# Altium PCB FPGA_Peripheral_Board.PcbDoc (part 2 of 5)
Units mm, origin at the board's own origin, x right, y up, seen from the top; angles counter-clockwise.
Board outline 78.8 x 69 mm, 4 copper layers (Top Layer, Int1 (GND), Int2 (PWR), Bottom Layer), stack 1.508 mm thick; 111 components, 280 nets, 1262 pads, 728 vias.
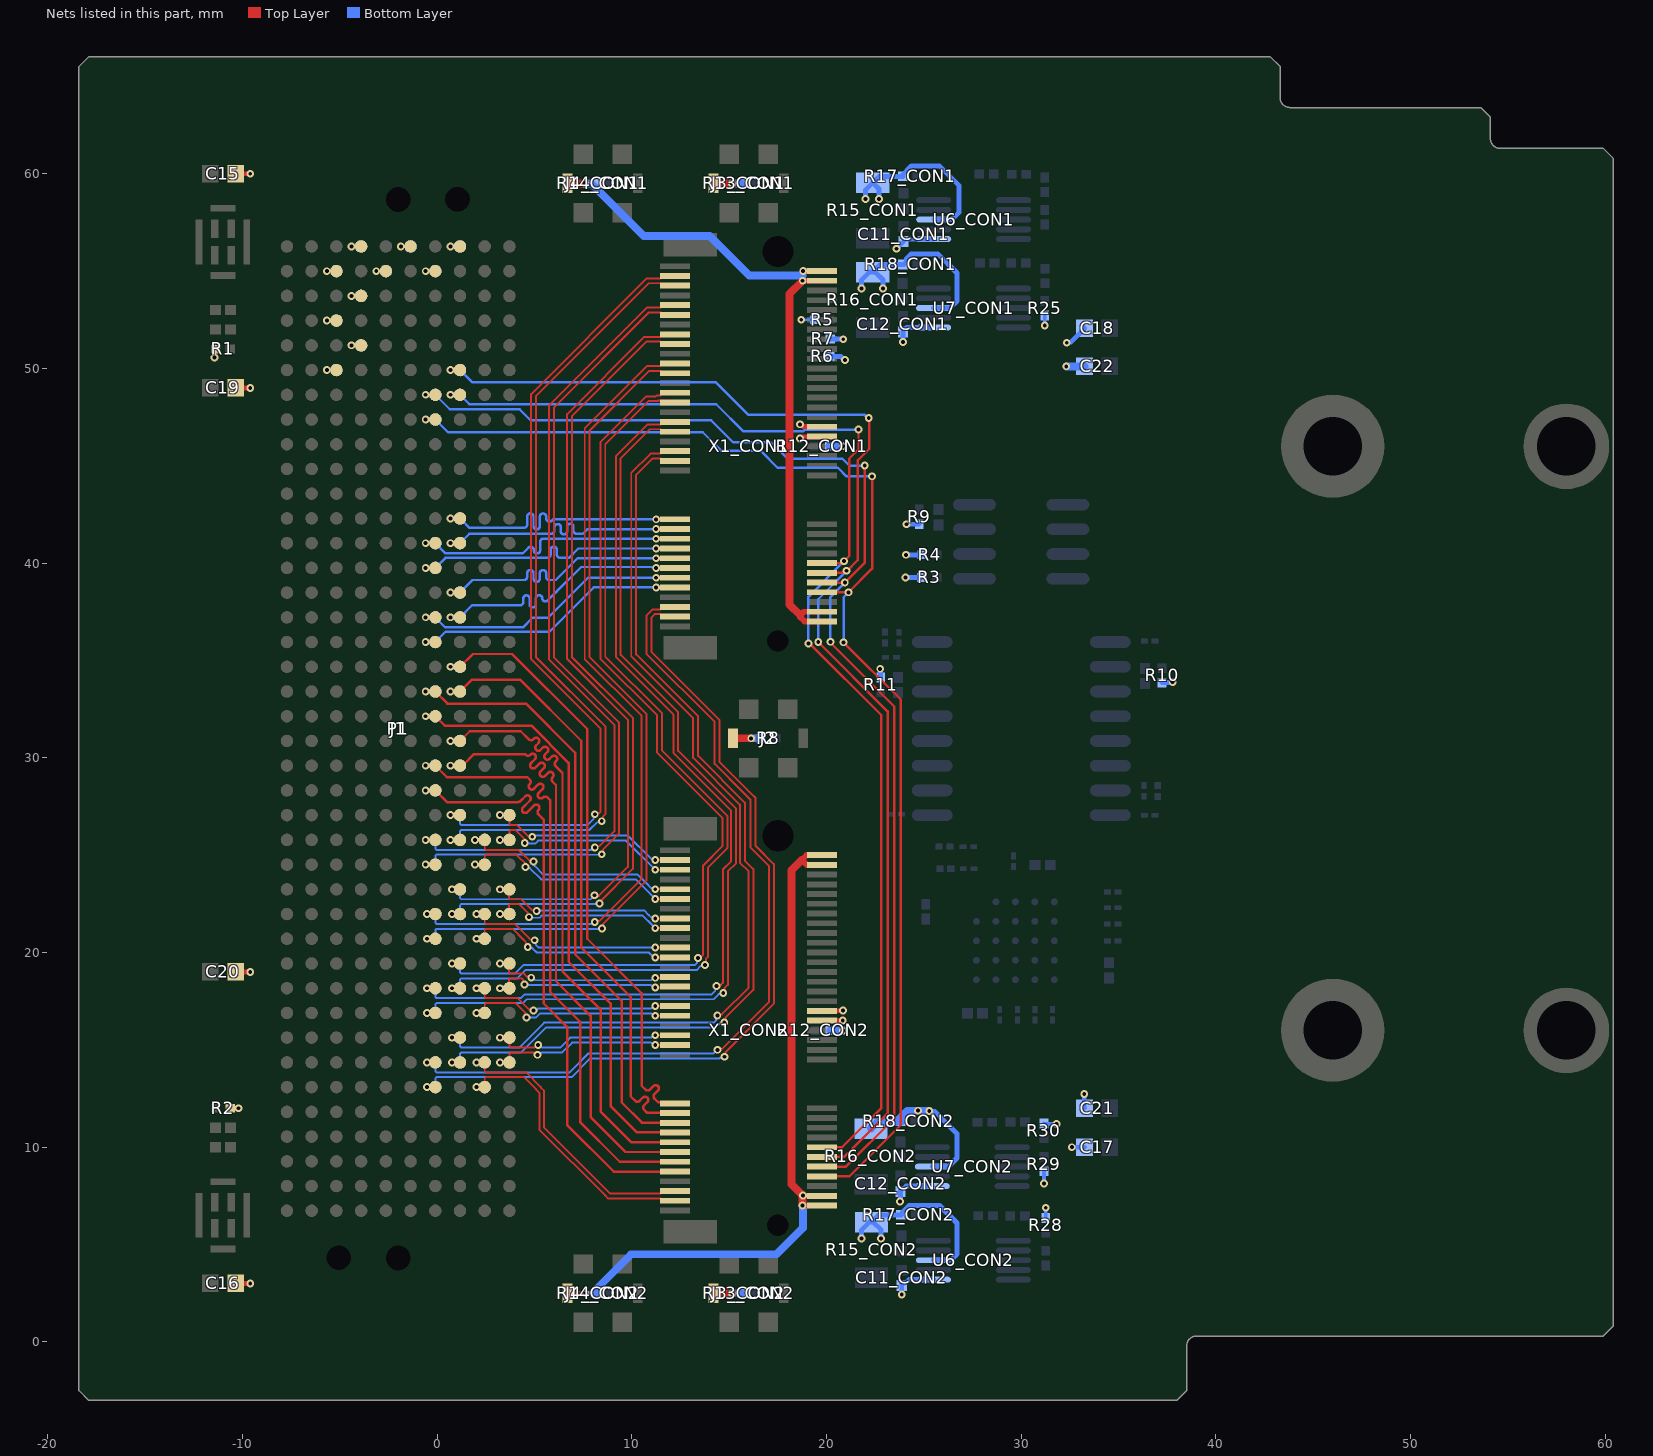
[diagram p4: the nets of this part, all layers, seen from the top]

## Part data
C1 C3: library part CMP-2008-02044-1, Case Code (Imperial)=0402, Dielectric=X5R, Dielectric Material=Ceramic, Manufacturer=Kemet, Manufacturer Part Number=C0402C105K9PACTU, Max Operating Temperature=85°C, Min Operating Temperature=-55°C, Package Quantity=1, Supplier Part Number 1=399-4873-6-ND, Tolerance=10%, Voltage=6.3V, Case/Package=0402, Category="Ceramic Capacitors", ComponentLink1Description=https://datasheet.ciiva.com/28645/1789732-28645392.pdf?src-supplier=Element14, ComponentLink1URL=https://datasheet.ciiva.com/28645/1789732-28645392.pdf?src-supplier=Element14, ComponentLink2Description=https://datasheet.ciiva.com/11786/0900766b8116eb59-11786028.pdf?src-supplier=RSComponents, ComponentLink2URL=https://datasheet.ciiva.com/11786/0900766b8116eb59-11786028.pdf?src-supplier=RSComponents, ComponentLink3Description=https://datasheet.ciiva.com/7747/kem-c1006-x5r-smd-7747445.pdf?src-supplier=Element14, ComponentLink3URL=https://datasheet.ciiva.com/7747/kem-c1006-x5r-smd-7747445.pdf?src-supplier=Element14, ComponentLink4Description=https://datasheet.ciiva.com/7747/40889-7747623.pdf?src-supplier=Element14, ComponentLink4URL=https://datasheet.ciiva.com/7747/40889-7747623.pdf?src-supplier=Element14, ComponentLink5Description=https://datasheet.ciiva.com/18192/getdatasheetpartid-127800-18192427.pdf?src-supplier=Verical, ComponentLink5URL=https://datasheet.ciiva.com/18192/getdatasheetpartid-127800-18192427.pdf?src-supplier=Verical, Depth=0.5mm, Height=0.5mm, Lead Free="Lead Free", Lead Pitch=0.3mm, Length=1mm, Mount="Surface Mount", Number of Pins=2, Packaging="Tape and Reel", Part Number=C0402C105K9PACTU, Pricing 1="1=0.10000, 10=0.02600, 100=0.01180, 500=0.00844, 1000=0.00662, 2500=0.00602, 5000=0.00554 (USD)", Radiation Hardening=No, REACH SVHC="No SVHC", RoHS=Yes, Stock 1=1737568, Supplier 1=Digi-Key, Termination=SMD/SMT, Thickness=0.022inch, Voltage Rating=6.3V, Voltage Rating (DC)=6.3V, Width=0.02inch
C2 C4 C5 C6 C7 C8 C9 C10 C11_CON1 C11_CON2 C12_CON1 C12_CON2 C13_CON1 C13_CON2 C14_CON1 C14_CON2: library part CMP-2000-05439-1, "Chip Capacitor, 100 nF, +/- 10%, 16 V, -55 to 125 degC, 0402 (1005 Metric), RoHS, Tape and Reel", Case Code (Imperial)=0402, Case Code (Metric)=1005, Dielectric=X7R, Manufacturer="Samsung Electro-Mechanics", Manufacturer Part Number=CL05B104KO5NNNC, Max Operating Temperature=125°C, Min Operating Temperature=-55°C, Package Quantity=1, Rated Voltage=16V, Supplier Part Number 1=1276-1001-1-ND, Tolerance=10%, Tolerance (%)=±10%, Case Size/Dimension=0402, Case/Package=0402, Category="Ceramic Capacitors", ComponentLink1Description=https://datasheet.ciiva.com/26920/getdatasheetpartid-359683-26920169.pdf?src-supplier=Verical, ComponentLink1URL=https://datasheet.ciiva.com/26920/getdatasheetpartid-359683-26920169.pdf?src-supplier=Verical, ComponentLink2Description=https://datasheet.ciiva.com/29198/458718-da-01-en-vs-kondensator-0402-29198423.pdf?src-supplier=Conrad, ComponentLink2URL=https://datasheet.ciiva.com/29198/458718-da-01-en-vs-kondensator-0402-29198423.pdf?src-supplier=Conrad, ComponentLink3Description=https://datasheet.ciiva.com/16208/cl05b104kq5nnnc-16208343.pdf?src-supplier=Future+Electronics, ComponentLink3URL=https://datasheet.ciiva.com/16208/cl05b104kq5nnnc-16208343.pdf?src-supplier=Future+Electronics, ComponentLink4Description=https://datasheet.ciiva.com/26309/mlcc-catalogdownload2013-eng-26309003.pdf?src-supplier=Distrelec, ComponentLink4URL=https://datasheet.ciiva.com/26309/mlcc-catalogdownload2013-eng-26309003.pdf?src-supplier=Distrelec, Contact Plating=Tin, Datasheet URL=https://datasheet.ciiva.com/29198/458718-da-01-en-vs-kondensator-0402-29198423.pdf, Datasheet Version=Nov-10, Depth=0.5mm, Height=0.5mm, Lead Free="Lead Free", Length=1mm, Manufacturer URL=http://www.samsungsem.com/global/index.jsp, Material=Ceramic, Mount="Surface Mount", Packaging="Tape and Reel", Pricing 1="1=0.10000, 10=0.02800, 50=0.01520, 100=0.01240, 500=0.00886, 1000=0.00696, 2500=0.00632, 5000=0.00582 (USD)", Radiation Hardening=No, RoHS=Yes, Stock 1=18886859, Supplier 1=Digi-Key, Thickness=0.022inch, Voltage=16V, Voltage Rating=16V, Voltage Rating (DC)=16V, Width=0.02inch
C15 C16 C17 C18 C19 C20 C21 C22: library part CMP-2006-04476-1, Case Code (Imperial)=0603, Case Code (Metric)=1608, Dielectric=X5R, Dielectric Material=Ceramic, Manufacturer="AVX Interconnect / Elco", Manufacturer Part Number=06036D106MAT2A, Max Operating Temperature=85°C, Min Operating Temperature=-55°C, Package Quantity=1, Supplier Part Number 1=478-5318-1-ND, Tolerance=20%, Voltage=6.3V, Case/Package=0603, Category="Ceramic Capacitors", ComponentLink1Description=https://datasheet.ciiva.com/153/cx5r-153301.pdf?src-supplier=Digi-Key, ComponentLink1URL=https://datasheet.ciiva.com/153/cx5r-153301.pdf?src-supplier=Digi-Key, ComponentLink2Description=https://datasheet.ciiva.com/1458/1796776-1458117.pdf?src-supplier=Element14, ComponentLink2URL=https://datasheet.ciiva.com/1458/1796776-1458117.pdf?src-supplier=Element14, ComponentLink3Description=https://datasheet.ciiva.com/153/cx5r-153302.pdf?src-supplier=Digi-Key, ComponentLink3URL=https://datasheet.ciiva.com/153/cx5r-153302.pdf?src-supplier=Digi-Key, ComponentLink4Description=https://datasheet.ciiva.com/153/cx5r-153303.pdf?src-supplier=Digi-Key, ComponentLink4URL=https://datasheet.ciiva.com/153/cx5r-153303.pdf?src-supplier=Digi-Key, ComponentLink5Description=https://datasheet.ciiva.com/5422/cx5r-33896-5422935.pdf?src-supplier=Mouser, ComponentLink5URL=https://datasheet.ciiva.com/5422/cx5r-33896-5422935.pdf?src-supplier=Mouser, ComponentLink6Description=https://datasheet.ciiva.com/16538/cx5r-16538025.pdf?src-supplier=Avnet+Asia, ComponentLink6URL=https://datasheet.ciiva.com/16538/cx5r-16538025.pdf?src-supplier=Avnet+Asia, ComponentLink7Description=https://datasheet.ciiva.com/2987/cx5r-2987866.pdf?src-supplier=Avnet, ComponentLink7URL=https://datasheet.ciiva.com/2987/cx5r-2987866.pdf?src-supplier=Avnet, ComponentLink8Description=https://datasheet.ciiva.com/14591/70001028-14591754.pdf?src-supplier=Allied+Electronics, ComponentLink8URL=https://datasheet.ciiva.com/14591/70001028-14591754.pdf?src-supplier=Allied+Electronics, ComponentLink9Description=https://datasheet.ciiva.com/2987/cx5r-2987867.pdf?src-supplier=Avnet, ComponentLink9URL=https://datasheet.ciiva.com/2987/cx5r-2987867.pdf?src-supplier=Avnet, ComponentLink10Description=https://datasheet.ciiva.com/16201/cx5r-16201627.pdf?src-supplier=Future+Electronics, ComponentLink10URL=https://datasheet.ciiva.com/16201/cx5r-16201627.pdf?src-supplier=Future+Electronics, Construction=Flat, Contact Plating=Tin,Matte, Depth=0.81mm, Height=0.9mm, Lead Free="Lead Free", Length=1.6mm, Mount="Surface Mount,PCB", Number of Pins=2, Packaging="Tape and Reel", Part Number=06036D106MAT2A, Pricing 1="1=0.24000, 10=0.16500, 50=0.09900, 100=0.08360, 500=0.05720, 1000=0.05060 (USD)", Radiation Hardening=No, REACH SVHC="No SVHC", RoHS=Yes, RoHS Compliant=Yes, Series=-, Stock 1=1934840, Supplier 1=Digi-Key, Termination=SMD/SMT, Thickness=0.035inch, Voltage Rating=6.3V, Voltage Rating (DC)=6.3V, Width=0.032inch
C23 C24 C25 C26: library part CMP-1033-00489-2, Case Code (Imperial)=0201, Case Code (Metric)=0603, Dielectric=X7R, Dielectric Material=Ceramic, Manufacturer="AVX Interconnect / Elco", Manufacturer Part Number=0201YC101KAT2A, Max Operating Temperature=125°C, Min Operating Temperature=-55°C, Package Quantity=15000, Supplier Part Number 1=478-1027-1-ND, Tolerance=10%, Voltage Rating=16V, Case/Package=0201, Category="Ceramic Capacitors", ComponentLink1Description=https://datasheet.ciiva.com/152/cx7r-152514.pdf?src-supplier=Digi-Key, ComponentLink1URL=https://datasheet.ciiva.com/152/cx7r-152514.pdf?src-supplier=Digi-Key, ComponentLink2Description=https://datasheet.ciiva.com/152/cx7r-152515.pdf?src-supplier=Digi-Key, ComponentLink2URL=https://datasheet.ciiva.com/152/cx7r-152515.pdf?src-supplier=Digi-Key, ComponentLink3Description=https://datasheet.ciiva.com/152/cx7r-152516.pdf?src-supplier=Digi-Key, ComponentLink3URL=https://datasheet.ciiva.com/152/cx7r-152516.pdf?src-supplier=Digi-Key, ComponentLink4Description=https://datasheet.ciiva.com/5427/cx7r-218113-5427893.pdf?src-supplier=Mouser, ComponentLink4URL=https://datasheet.ciiva.com/5427/cx7r-218113-5427893.pdf?src-supplier=Mouser, ComponentLink5Description=https://datasheet.ciiva.com/2990/cx7r-2990106.pdf?src-supplier=Avnet, ComponentLink5URL=https://datasheet.ciiva.com/2990/cx7r-2990106.pdf?src-supplier=Avnet, ComponentLink6Description=https://datasheet.ciiva.com/16328/cx7r-16328234.pdf?src-supplier=Future+Electronics, ComponentLink6URL=https://datasheet.ciiva.com/16328/cx7r-16328234.pdf?src-supplier=Future+Electronics, ComponentLink7Description=https://datasheet.ciiva.com/1123/683218-1123133.pdf?src-supplier=Element14, ComponentLink7URL=https://datasheet.ciiva.com/1123/683218-1123133.pdf?src-supplier=Element14, ComponentLink8Description=https://datasheet.ciiva.com/2987/cx7r-2987629.pdf?src-supplier=Avnet, ComponentLink8URL=https://datasheet.ciiva.com/2987/cx7r-2987629.pdf?src-supplier=Avnet, Construction=Flat, Depth=0.3mm, Lead Free="Lead Free", Length=0.6mm, Mount="Surface Mount", Number of Pins=2, Packaging="Tape and Reel", Part Number=0201YC101KAT2A, Pricing 1="1=0.36000, 10=0.24800, 50=0.17320, 100=0.14850, 500=0.11138, 1000=0.09405, 2500=0.08910, 5000=0.08415 (USD)", Radiation Hardening=No, REACH SVHC="No SVHC", RoHS=Yes, RoHS Compliant=Yes, Series=-, Stock 1=18398, Supplier 1=Digi-Key, Termination=SMD/SMT, Thickness=0.013inch, Voltage Rating (DC)=16V, Width=0.012inch
J1: library part CMP-0001-00082-1, "Board-to-Board Connector, Vertical, 10-Row, Pitch 1.27mm, 400-Position, Female", Housing Color=Black, Manufacturer=Samtec, Package Reference=BTB-SM1-27-2V400F, Supplier Part Number 1=SAM8728CT-ND, Category="Board to Board Connectors", ClassName="Board Template Connector", ComponentLink1Description=https://datasheet.ciiva.com/26877/getdatasheetpartid-699855-26877302.pdf?src-supplier=Verical, ComponentLink1URL=https://datasheet.ciiva.com/26877/getdatasheetpartid-699855-26877302.pdf?src-supplier=Verical, Contact Material="Copper Alloy", Contact Plating=Gold, Datasheet Version=May-2008, Depth=13.23mm, Gender=Receptacle, Manufacturer Part Number=ASP-134486-01, Mating Connector=ASP-134488-01, Mount="Surface Mount", Number of Contacts=400, Number of Positions=400, Number of Rows=10, Orientation=Straight, Packaging="Tape and Reel", PartId=1, Pitch=1.27mm, Pricing 1="1=27.42000, 10=24.74900, 25=23.71200, 50=22.23000, 100=21.48900 (USD)", Publisher=Altium, Radiation Hardening=No, REACH SVHC="No SVHC", RoHS=Yes, RoHS Compliant=Yes, Series=ASP, Stock 1=2693, Supplier 1=Digi-Key, Termination=Solder
J2 J3_CON1 J3_CON2 J4_CON1 J4_CON2: library part CMP-01324-2, "SWD Connector Receptacle, Female Socket 50Ohm Surface Mount Solder", Case/Package=SMD/SMT, Housing Color=Silver, Manufacturer=Murata, Manufacturer Part Number=MM8430-2610RA1, Max Frequency=6GHz, Max Operating Temperature=85°C, Min Operating Temperature=-40°C, Package Quantity=1, Supplier Part Number 1=490-4980-1-ND, Category="RF / Coaxial Connectors", ComponentLink1Description=https://datasheet.ciiva.com/18119/getdatasheetpartid-163587-18119363.pdf?src-supplier=Verical, ComponentLink1URL=https://datasheet.ciiva.com/18119/getdatasheetpartid-163587-18119363.pdf?src-supplier=Verical, ComponentLink2Description=https://datasheet.ciiva.com/18119/getdatasheetpartid-153066-18119191.pdf?src-supplier=Verical, ComponentLink2URL=https://datasheet.ciiva.com/18119/getdatasheetpartid-153066-18119191.pdf?src-supplier=Verical, ComponentLink3Description=https://datasheet.ciiva.com/642/o33e-642736.pdf?src-supplier=Digi-Key, ComponentLink3URL=https://datasheet.ciiva.com/642/o33e-642736.pdf?src-supplier=Digi-Key, ComponentLink4Description=https://datasheet.ciiva.com/16465/l0391e-16465770.pdf?src-supplier=Future+Electronics, ComponentLink4URL=https://datasheet.ciiva.com/16465/l0391e-16465770.pdf?src-supplier=Future+Electronics, ComponentLink5Description=https://datasheet.ciiva.com/642/o33e-642735.pdf?src-supplier=Digi-Key, ComponentLink5URL=https://datasheet.ciiva.com/642/o33e-642735.pdf?src-supplier=Digi-Key, Connector Type=Socket, Contact Material="Copper Alloy", Contact Plating=Gold, Depth=3mm, Fastening Type=Pull, Impedance=50R, Insulation Material=Plastic, Lead Free="Lead Free", Length=3mm, Mount="Surface Mount", Orientation=Straight, Packaging="Tape and Reel", Polarity=Standard, Pricing 1="1=0.49000, 10=0.45800, 25=0.41200, 50=0.36620, 100=0.35100, 250=0.32048, 500=0.30520 (USD)", Radiation Hardening=No, RoHS=Yes, Series=8430, Stock 1=398, Supplier 1=Digi-Key, Termination=Solder
M1_CON1 M1_CON2: library part CMP-01222-1, "RND STANDOFF M2X0.4 STEEL 1.5MM", Manufacturer="Wurth Electronics", Manufacturer Part Number=9774015243R, Supplier Part Number 1=732-7069-1-ND, Category="Spacers, Standoffs", ComponentLink1Description=http://www.mouser.com/ds/2/445/9774015243R-611439.pdf?src-supplier=Mouser, ComponentLink1URL=http://www.mouser.com/ds/2/445/9774015243R-611439.pdf?src-supplier=Mouser, ComponentLink2Description=http://www.farnell.com/datasheets/1960361.pdf?src-supplier=Farnell, ComponentLink2URL=http://www.farnell.com/datasheets/1960361.pdf?src-supplier=Farnell, ComponentLink3Description=https://media.digikey.com/pdf/Data%20Sheets/Wurth%20Electronics%20PDFs/WA-SMSx_Performance_Flyer.pdf?src-supplier=Digi-Key, ComponentLink3URL=https://media.digikey.com/pdf/Data%20Sheets/Wurth%20Electronics%20PDFs/WA-SMSx_Performance_Flyer.pdf?src-supplier=Digi-Key, ComponentLink4Description=http://www.farnell.com/datasheets/1960361.pdf?src-supplier=Element14, ComponentLink4URL=http://www.farnell.com/datasheets/1960361.pdf?src-supplier=Element14, ComponentLink5Description=https://katalog.we-online.de/em/datasheet/9774015243R.pdf?src-supplier=Digi-Key, ComponentLink5URL=https://katalog.we-online.de/em/datasheet/9774015243R.pdf?src-supplier=Digi-Key, ComponentLink6Description=http://www.farnell.com/datasheets/1960361.pdf?src-supplier=Newark, ComponentLink6URL=http://www.farnell.com/datasheets/1960361.pdf?src-supplier=Newark, Length=0.114inch, Material=Steel, Outside Diameter=0.171inch, Plating=Tin, Pricing 1="1=1.09000, 10=1.03000, 50=0.91800, 100=0.84000, 500=0.78400 (USD)", REACH SVHC=Unknown, RoHS=Yes, Stock 1=6453, Supplier 1=Digi-Key, Threaded/Unthreaded=Threaded
M2_CON1 M2_CON2: library part CMP-01222-1, "RND STANDOFF M2X0.4 STEEL 1.5MM", Manufacturer="Wurth Electronics", Supplier Part Number 1=732-7069-1-ND, Category="Spacers, Standoffs", ComponentLink1Description=http://www.mouser.com/ds/2/445/9774015243R-611439.pdf?src-supplier=Mouser, ComponentLink1URL=http://www.mouser.com/ds/2/445/9774015243R-611439.pdf?src-supplier=Mouser, ComponentLink2Description=http://www.farnell.com/datasheets/1960361.pdf?src-supplier=Farnell, ComponentLink2URL=http://www.farnell.com/datasheets/1960361.pdf?src-supplier=Farnell, ComponentLink3Description=https://media.digikey.com/pdf/Data%20Sheets/Wurth%20Electronics%20PDFs/WA-SMSx_Performance_Flyer.pdf?src-supplier=Digi-Key, ComponentLink3URL=https://media.digikey.com/pdf/Data%20Sheets/Wurth%20Electronics%20PDFs/WA-SMSx_Performance_Flyer.pdf?src-supplier=Digi-Key, ComponentLink4Description=http://www.farnell.com/datasheets/1960361.pdf?src-supplier=Element14, ComponentLink4URL=http://www.farnell.com/datasheets/1960361.pdf?src-supplier=Element14, ComponentLink5Description=https://katalog.we-online.de/em/datasheet/9774015243R.pdf?src-supplier=Digi-Key, ComponentLink5URL=https://katalog.we-online.de/em/datasheet/9774015243R.pdf?src-supplier=Digi-Key, ComponentLink6Description=http://www.farnell.com/datasheets/1960361.pdf?src-supplier=Newark, ComponentLink6URL=http://www.farnell.com/datasheets/1960361.pdf?src-supplier=Newark, Length=0.114inch, Manufacturer Part Number=9774015243R, Material=Steel, Outside Diameter=0.171inch, Plating=Tin, Pricing 1="1=1.09000, 10=1.03000, 50=0.91800, 100=0.84000, 500=0.78400 (USD)", REACH SVHC=Unknown, RoHS=Yes, Stock 1=6453, Supplier 1=Digi-Key, Threaded/Unthreaded=Threaded
P1: library part CMP-0001-00022-1, "Board-to-Board Connector, Vertical, 10-Row, Pitch 1.27mm, 400-Position", Manufacturer=Samtec, Package Quantity=1, Package Reference=BTB-SM1-27-2V400M, Supplier Part Number 1=SAM8730-ND, Category=Connectors, ClassName="Board Template Connector", ComponentLink1Description=https://datasheet.ciiva.com/403/asp-134488-01-403749.pdf?src-supplier=Digi-Key, ComponentLink1URL=https://datasheet.ciiva.com/403/asp-134488-01-403749.pdf?src-supplier=Digi-Key, ComponentLink2Description=https://datasheet.ciiva.com/9532/asp-134488-01-9532666.pdf?src-supplier=Avnet, ComponentLink2URL=https://datasheet.ciiva.com/9532/asp-134488-01-9532666.pdf?src-supplier=Avnet, Contact Material="Copper Alloy", Contact Plating=Gold, Datasheet Version=Feb-2007, Gender=Male, Manufacturer Part Number=ASP-134488-01, Mating Connector=ASP-134486-01, Mount="Surface Mount", Number of Contacts=400, Number of Positions=400, Number of Rows=10, Packaging="Tape and Reel", PartId=1, Pitch=0.05inch, Pricing 1="1=27.73000, 10=25.03300, 25=23.98400, 50=22.48500, 100=21.73550, 250=20.53632, 500=19.93670, 1000=19.48700 (USD)", Publisher=Altium, Radiation Hardening=No, REACH SVHC="No SVHC", RoHS=Yes, RoHS Compliant=Yes, Series=ASP, Stock 1=4276, Supplier 1=Digi-Key, Termination=SMD/SMT
R1 R2 R8 R9 R10 R11 R12_CON1 R12_CON2 R13_CON1 R13_CON2 R14_CON1 R14_CON2 R19_CON1 R19_CON2 R20_CON1 R20_CON2 R21_CON1 R21_CON2 R22_CON1 R22_CON2 R23 R24 R25 R26 R27 R28 R29 R30: library part CMP-2002-07912-1, Case Code (Imperial)=0402, Case Code (Metric)=1005, Manufacturer=Yageo, Manufacturer Part Number=RC0402JR-070RL, Max Operating Temperature=155°C, Max Power Dissipation=63mW, Min Operating Temperature=-55°C, Package Quantity=1, Power Rating=62.5mW, Resistor Type="Thick Film", Supplier Part Number 1=311-0.0JRCT-ND, Temperature Coefficient=200ppm/°C, Tolerance=5%, Voltage Rating=50V, Case/Package=0402, Category="Chip SMD Resistors", ComponentLink1Description=https://datasheet.ciiva.com/2452/pyu-rc0402-51-rohs-l-6-2452608.pdf?src-supplier=Digi-Key, ComponentLink1URL=https://datasheet.ciiva.com/2452/pyu-rc0402-51-rohs-l-6-2452608.pdf?src-supplier=Digi-Key, ComponentLink2Description=https://datasheet.ciiva.com/11808/0900766b80c66297-11808195.pdf?src-supplier=RSComponents, ComponentLink2URL=https://datasheet.ciiva.com/11808/0900766b80c66297-11808195.pdf?src-supplier=RSComponents, ComponentLink3Description=https://datasheet.ciiva.com/2452/pyu-r-int-thick-7-2452609.pdf?src-supplier=Digi-Key, ComponentLink3URL=https://datasheet.ciiva.com/2452/pyu-r-int-thick-7-2452609.pdf?src-supplier=Digi-Key, ComponentLink4Description=https://datasheet.ciiva.com/2452/pyu-r-int-thick-7-2452610.pdf?src-supplier=Digi-Key, ComponentLink4URL=https://datasheet.ciiva.com/2452/pyu-r-int-thick-7-2452610.pdf?src-supplier=Digi-Key, ComponentLink5Description=https://datasheet.ciiva.com/8896/pyu-rc0402-51-rohs-l-6-8896201.pdf?src-supplier=Avnet, ComponentLink5URL=https://datasheet.ciiva.com/8896/pyu-rc0402-51-rohs-l-6-8896201.pdf?src-supplier=Avnet, ComponentLink6Description=https://datasheet.ciiva.com/28386/pyu-rc0402-51-rohs-l-6-28386633.pdf?src-supplier=Avnet+Europe, ComponentLink6URL=https://datasheet.ciiva.com/28386/pyu-rc0402-51-rohs-l-6-28386633.pdf?src-supplier=Avnet+Europe, ComponentLink7Description=https://datasheet.ciiva.com/22747/1018594-22747515.pdf?src-supplier=Element14, ComponentLink7URL=https://datasheet.ciiva.com/22747/1018594-22747515.pdf?src-supplier=Element14, ComponentLink8Description=https://datasheet.ciiva.com/15189/getdatasheetpartid-326379-15189533.pdf?src-supplier=Verical, ComponentLink8URL=https://datasheet.ciiva.com/15189/getdatasheetpartid-326379-15189533.pdf?src-supplier=Verical, ComponentLink9Description=https://datasheet.ciiva.com/7983/1018594-7983535.pdf?src-supplier=Element14, ComponentLink9URL=https://datasheet.ciiva.com/7983/1018594-7983535.pdf?src-supplier=Element14, Contact Plating=Tin,Matte, Depth=0.5mm, Features="Moisture Resistant", Height=0.016inch, Lead Free="Lead Free", Length=1mm, Military Standard=Not, Number of Terminations=2, Packaging="Tape and Reel", Part Number=RC0402JR-070RL, Pricing 1="1=0.10000, 10=0.01200, 25=0.00840, 50=0.00640, 100=0.00480, 250=0.00364, 500=0.00292, 1000=0.00215, 5000=0.00154 (USD)", Radiation Hardening=No, REACH SVHC=Unknown, RoHS=Yes, Stock 1=44193294, Supplier 1=Digi-Key, Termination=SMD/SMT, Width=0.02inch
R3 R4 R5 R6: library part CMP-2002-07567-1, Case Code (Imperial)=0402, Case Code (Metric)=1005, Manufacturer="Yageo / Phycomp", Manufacturer Part Number=RC0402FR-072K2L, Max Operating Temperature=155°C, Max Power Dissipation=63mW, Min Operating Temperature=-55°C, Resistance Tolerance=1%, Resistor Type="Thick Film", Supplier Part Number 1=311-2.20KLRCT-ND, Temperature Coefficient=100ppm/°C, Voltage Rating=50V, Case/Package=0402, Category="Chip SMD Resistors", ComponentLink1Description=https://datasheet.ciiva.com/11808/0900766b80c66297-11808786.pdf?src-supplier=RSComponents, ComponentLink1URL=https://datasheet.ciiva.com/11808/0900766b80c66297-11808786.pdf?src-supplier=RSComponents, ComponentLink2Description=https://datasheet.ciiva.com/12577/pyu-rc0402-51-rohs-l-6-r-12577429.pdf?src-supplier=Mouser, ComponentLink2URL=https://datasheet.ciiva.com/12577/pyu-rc0402-51-rohs-l-6-r-12577429.pdf?src-supplier=Mouser, ComponentLink3Description=https://datasheet.ciiva.com/16741/pyu-rc0402-51-rohs-l-6-r-16741015.pdf?src-supplier=Future+Electronics, ComponentLink3URL=https://datasheet.ciiva.com/16741/pyu-rc0402-51-rohs-l-6-r-16741015.pdf?src-supplier=Future+Electronics, ComponentLink4Description=https://datasheet.ciiva.com/7849/1018594-7849928.pdf?src-supplier=Element14, ComponentLink4URL=https://datasheet.ciiva.com/7849/1018594-7849928.pdf?src-supplier=Element14, ComponentLink5Description=https://datasheet.ciiva.com/7849/1018594-7849929.pdf?src-supplier=Element14, ComponentLink5URL=https://datasheet.ciiva.com/7849/1018594-7849929.pdf?src-supplier=Element14, ComponentLink6Description=https://datasheet.ciiva.com/7983/1018594-7983515.pdf?src-supplier=Element14, ComponentLink6URL=https://datasheet.ciiva.com/7983/1018594-7983515.pdf?src-supplier=Element14, ComponentLink7Description=https://datasheet.ciiva.com/46383/1018594-46383563.pdf?src-supplier=Element14, ComponentLink7URL=https://datasheet.ciiva.com/46383/1018594-46383563.pdf?src-supplier=Element14, Construction=Rectangular, Depth=0.5mm, Features="Moisture Resistant", Height=0.35mm, Lead Free="Lead Free", Length=1mm, Military Standard=Not, Number of Terminations=2, Packaging="Tape and Reel", Part Number=RC0402FR-072K2L, Power Rating=63mW, Pricing 1="1=0.10000, 10=0.01400, 100=0.00580, 1000=0.00260, 2500=0.00226, 5000=0.00186 (USD)", REACH SVHC=Unknown, RoHS=Yes, RoHS Compliant=Yes, Series=RC, Size Code=0402, Stock 1=3865260, Supplier 1=Digi-Key, Technology="THICK FILM", Termination=SMD/SMT, Tolerance=1%, Weight=2.3E-05oz, Width=0.5mm
R7: library part CMP-2002-07353-1, Case Code (Imperial)=0402, Case Code (Metric)=1005, Manufacturer="Yageo / Phycomp", Manufacturer Part Number=RC0402FR-0710KL, Max Operating Temperature=155°C, Max Power Dissipation=63mW, Min Operating Temperature=-55°C, Power Rating=62.5mW, Resistance Tolerance=1%, Resistor Type="Thick Film", Supplier Part Number 1=311-10.0KLRCT-ND, Temperature Coefficient=100ppm/°C, Voltage Rating=50V, Case/Package=0402, Category="Chip SMD Resistors", ComponentLink1Description=https://datasheet.ciiva.com/7660/38568-7660787.pdf?src-supplier=Element14, ComponentLink1URL=https://datasheet.ciiva.com/7660/38568-7660787.pdf?src-supplier=Element14, ComponentLink2Description=https://datasheet.ciiva.com/7849/1784430-7849813.pdf?src-supplier=Element14, ComponentLink2URL=https://datasheet.ciiva.com/7849/1784430-7849813.pdf?src-supplier=Element14, ComponentLink3Description=https://datasheet.ciiva.com/7849/1686128-7849814.pdf?src-supplier=Element14, ComponentLink3URL=https://datasheet.ciiva.com/7849/1686128-7849814.pdf?src-supplier=Element14, ComponentLink4Description=https://datasheet.ciiva.com/7849/1784430-7849815.pdf?src-supplier=Element14, ComponentLink4URL=https://datasheet.ciiva.com/7849/1784430-7849815.pdf?src-supplier=Element14, ComponentLink5Description=https://datasheet.ciiva.com/22747/1018594-22747512.pdf?src-supplier=Element14, ComponentLink5URL=https://datasheet.ciiva.com/22747/1018594-22747512.pdf?src-supplier=Element14, ComponentLink6Description=https://datasheet.ciiva.com/12667/pyu-rc0402-51-rohs-l-6-r-12667067.pdf?src-supplier=Mouser, ComponentLink6URL=https://datasheet.ciiva.com/12667/pyu-rc0402-51-rohs-l-6-r-12667067.pdf?src-supplier=Mouser, ComponentLink7Description=https://datasheet.ciiva.com/7983/1018594-7983486.pdf?src-supplier=Element14, ComponentLink7URL=https://datasheet.ciiva.com/7983/1018594-7983486.pdf?src-supplier=Element14, Construction=Rectangular, Depth=0.5mm, Features="Moisture Resistant", Height=0.32mm, Lead Free="Lead Free", Lead Pitch=0.2mm, Length=1mm, Military Standard=Not, Number of Pins=2, Number of Terminations=2, Packaging="Tape and Reel", Part Number=RC0402FR-0710KL, Pricing 1="1=0.10000, 10=0.01400, 100=0.00580, 1000=0.00260, 2500=0.00226, 5000=0.00186 (USD)", REACH SVHC="No SVHC", RoHS=Yes, RoHS Compliant=Yes, Series=RC, Stock 1=39342268, Supplier 1=Digi-Key, Termination=SMD/SMT, Tolerance=1%, Voltage Rating (DC)=50V, Width=0.5mm, Working Voltage=50V
R15_CON1 R15_CON2 R16_CON1 R16_CON2: library part CMP-2003-04059-1, Case Code (Imperial)=1206, Case Code (Metric)=3216, Manufacturer=Yageo, Manufacturer Part Number=RL1206FR-070R01L, Max Operating Temperature=125°C, Max Power Dissipation=250mW, Min Operating Temperature=-55°C, Package Quantity=1, Resistor Type="Thick Film", Supplier Part Number 1=311-0.01LWCT-ND, Temperature Coefficient=1500ppm/°C, Tolerance=1%, Case/Package=1206, Category="Chip SMD Resistors", ComponentLink1Description=https://datasheet.ciiva.com/5557/pyu-rl-hp-521-rohs-l-2-5557947.pdf?src-supplier=Mouser, ComponentLink1URL=https://datasheet.ciiva.com/5557/pyu-rl-hp-521-rohs-l-2-5557947.pdf?src-supplier=Mouser, Construction=Rectangular, Contact Plating=Tin,Lead, Depth=1.6mm, Features="Moisture Resistant", Height=0.026inch, Lead Free="Lead Free", Length=3.1mm, Military Standard=Not, Number of Terminations=2, Packaging="Tape and Reel", Part Number=RL1206FR-070R01L, Power Rating=250mW, Pricing 1="1=0.61000, 10=0.47000, 100=0.19750, 1000=0.10896, 2500=0.10215 (USD)", Radiation Hardening=No, RoHS=Yes, RoHS Compliant=Yes, Series=RL, Size Code=1206, Stock 1=76097, Supplier 1=Digi-Key, Technology="THICK FILM", Termination=SMD/SMT, Width=0.063inch
R17_CON1 R17_CON2 R18_CON1 R18_CON2: library part CMP-2002-04714-1, Case Code (Imperial)=0402, Case Code (Metric)=1005, Manufacturer=Bourns, Manufacturer Part Number=CR0402-FX-10R0GLF, Max Operating Temperature=125°C, Max Power Dissipation=63mW, Min Operating Temperature=-55°C, Package Quantity=1, Power Rating=62.5mW, Resistor Type="Thick Film", Supplier Part Number 1=CR0402-FX-10R0GLFCT-ND, Temperature Coefficient=100ppm/°C, Tolerance=1%, Voltage Rating=50V, Case/Package=0402, Category="Chip SMD Resistors", ComponentLink1Description=https://datasheet.ciiva.com/6562/cr0402-6562982.pdf?src-supplier=Digi-Key, ComponentLink1URL=https://datasheet.ciiva.com/6562/cr0402-6562982.pdf?src-supplier=Digi-Key, ComponentLink2Description=https://datasheet.ciiva.com/6562/cr0402-6562983.pdf?src-supplier=Digi-Key, ComponentLink2URL=https://datasheet.ciiva.com/6562/cr0402-6562983.pdf?src-supplier=Digi-Key, ComponentLink3Description=https://datasheet.ciiva.com/16938/cr0402-16938199.pdf?src-supplier=Avnet+Europe, ComponentLink3URL=https://datasheet.ciiva.com/16938/cr0402-16938199.pdf?src-supplier=Avnet+Europe, ComponentLink4Description=https://datasheet.ciiva.com/30075/cr0402-30075881.pdf?src-supplier=Onlinecomponents.com, ComponentLink4URL=https://datasheet.ciiva.com/30075/cr0402-30075881.pdf?src-supplier=Onlinecomponents.com, ComponentLink5Description=https://datasheet.ciiva.com/9122/cr0402-9122317.pdf?src-supplier=Avnet, ComponentLink5URL=https://datasheet.ciiva.com/9122/cr0402-9122317.pdf?src-supplier=Avnet, Construction=Rectangular, Contact Plating=Tin, Depth=0.5mm, Height=0.016inch, Length=1mm, Military Standard=Not, Mount="Surface Mount", Number of Terminations=2, Packaging="Tape and Reel", Part Number=CR0402-FX-10R0GLF, Pricing 1="1=0.10000, 10=0.01000, 100=0.00400, 1000=0.00178, 2500=0.00154, 5000=0.00127 (USD)", Radiation Hardening=No, RoHS=Yes, RoHS Compliant=Yes, Series=CR0402, Stock 1=21562, Supplier 1=Digi-Key, Termination=SMD/SMT, Thickness=356um, Width=0.5mm
R31 R33 R34 R35 R36 R37 R38 R39 R40 R41 R42 R43 R44 R45 R46 R47 R48: library part CMP-2004-02983-1, Case Code (Imperial)=0201, Case Code (Metric)=0603, Manufacturer=Panasonic, Manufacturer Part Number=ERJ-1GEF49R9C, Max Operating Temperature=125°C, Max Power Dissipation=50mW, Min Operating Temperature=-55°C, Package Quantity=1, Resistance Tolerance=1%, Resistor Type="Thick Film", Supplier Part Number 1=P49.9ABCT-ND, Temperature Coefficient=200ppm/°C, Voltage Rating=25V, Voltage Rating (DC)=15V, Case/Package=0201, Category="Chip SMD Resistors", ComponentLink1Description=https://datasheet.ciiva.com/16201/erj-1gef49r9c-16201490.pdf?src-supplier=Future+Electronics, ComponentLink1URL=https://datasheet.ciiva.com/16201/erj-1gef49r9c-16201490.pdf?src-supplier=Future+Electronics, ComponentLink2Description=https://datasheet.ciiva.com/2439/erj-g-r-e-rev08-2439298.pdf?src-supplier=Digi-Key, ComponentLink2URL=https://datasheet.ciiva.com/2439/erj-g-r-e-rev08-2439298.pdf?src-supplier=Digi-Key, ComponentLink3Description=https://datasheet.ciiva.com/2439/erj-g-r-e-rev08-2439299.pdf?src-supplier=Digi-Key, ComponentLink3URL=https://datasheet.ciiva.com/2439/erj-g-r-e-rev08-2439299.pdf?src-supplier=Digi-Key, ComponentLink4Description=https://datasheet.ciiva.com/2439/erj-g-r-e-rev08-2439300.pdf?src-supplier=Digi-Key, ComponentLink4URL=https://datasheet.ciiva.com/2439/erj-g-r-e-rev08-2439300.pdf?src-supplier=Digi-Key, ComponentLink5Description=https://datasheet.ciiva.com/16777/70260683-16777270.pdf?src-supplier=Allied+Electronics, ComponentLink5URL=https://datasheet.ciiva.com/16777/70260683-16777270.pdf?src-supplier=Allied+Electronics, ComponentLink6Description=https://datasheet.ciiva.com/28548/1694929-28548246.pdf?src-supplier=Element14, ComponentLink6URL=https://datasheet.ciiva.com/28548/1694929-28548246.pdf?src-supplier=Element14, ComponentLink7Description=https://datasheet.ciiva.com/30159/aoa0000ce2-30159798.pdf?src-supplier=Onlinecomponents.com, ComponentLink7URL=https://datasheet.ciiva.com/30159/aoa0000ce2-30159798.pdf?src-supplier=Onlinecomponents.com, ComponentLink8Description=https://datasheet.ciiva.com/7920/1678796-7920599.pdf?src-supplier=Element14, ComponentLink8URL=https://datasheet.ciiva.com/7920/1678796-7920599.pdf?src-supplier=Element14, Construction=Rectangular, Contact Plating=Tin, Depth=0.3mm, Height=0.23mm, Lead Free="Lead Free", Length=0.6mm, Military Standard=Not, Mount="Surface Mount", Number of Terminations=2, Packaging="Tape and Reel", Part Number=ERJ-1GEF49R9C, Power Rating=50mW, Pricing 1="1=0.10000, 10=0.03800, 100=0.01530, 1000=0.00689, 2500=0.00598, 5000=0.00494 (USD)", Radiation Hardening=No, REACH SVHC=Unknown, RoHS=Yes, RoHS Compliant=Yes, Series=ERJ, Stock 1=2, Supplier 1=Digi-Key, Technology="THICK FILM", Termination=SMD/SMT, Tolerance=1%, Width=0.012inch, Working Voltage=25V
R32: library part CMP-2004-00005-1, Case Code (Imperial)=0201, Case Code (Metric)=0603, Manufacturer=Vishay, Manufacturer Part Number=CRCW0201100RFKED, Max Operating Temperature=155°C, Max Power Dissipation=50mW, Min Operating Temperature=-55°C, Package Quantity=10000, Resistance Tolerance=1%, Resistor Type="Thick Film", Supplier Part Number 1=541-100AABCT-ND, Temperature Coefficient=100ppm/°C, Voltage Rating=30V, Case/Package=0201, Category="Chip SMD Resistors", ComponentLink1Description=https://datasheet.ciiva.com/17172/crcw0201e3-17172232.pdf?src-supplier=Avnet+Europe, ComponentLink1URL=https://datasheet.ciiva.com/17172/crcw0201e3-17172232.pdf?src-supplier=Avnet+Europe, ComponentLink2Description=https://datasheet.ciiva.com/16207/dcrcwe3-16207386.pdf?src-supplier=Future+Electronics, ComponentLink2URL=https://datasheet.ciiva.com/16207/dcrcwe3-16207386.pdf?src-supplier=Future+Electronics, Construction=Rectangular, Contact Plating=Tin, Depth=0.3mm, Height=0.23mm, Length=0.6mm, Military Standard=Not, Mount="Surface Mount", Number of Pins=2, Number of Terminations=2, Packaging="Tape and Reel", Part Number=CRCW0201100RFKED, Power Rating=50mW, Pricing 1="1=0.25000, 10=0.20900, 100=0.08170, 1000=0.03420, 2500=0.03135, 5000=0.02850 (USD)", Radiation Hardening=No, REACH SVHC=Unknown, RoHS=Yes, RoHS Compliant=Yes, Series=CRCW, Size Code=0201, Stock 1=306407, Supplier 1=Digi-Key, Termination=SMD/SMT, Tolerance=1%, Weight=6E-06oz, Width=0.3mm
U1 U2: library part CMP-12231-000001-1, "MEMS AUD MIC SENSOR OMNI 4HCLGA", Current=650uA, Frequency=2.4MHz, Manufacturer=STMicroelectronics, Max Power Dissipation=1W, Max Supply Voltage=3.6V, Min Supply Voltage=1.6V, Operating Supply Voltage=1.8V, Package=HCLGA-DM00231908, Power Rating=700mW, Ratings="IP67,Waterproof,Dust Tight", Self Resonant Frequency=850Hz, Supplier Part Number 1=497-17809-1-ND, Temperature="-40°C to +85°C", Temperature Range High=+85°C, Temperature Range Low=-40°C, Automotive=No, Category=IC, ComponentLink1Description=http://www.farnell.com/datasheets/2600073.pdf?src-supplier=Farnell, ComponentLink1URL=http://www.farnell.com/datasheets/2600073.pdf?src-supplier=Farnell, ComponentLink2Description=Datasheet, ComponentLink2URL=https://www.st.com/resource/en/datasheet/mp34dt05-a.pdf, ComponentLink3Description=http://www.st.com/content/ccc/resource/technical/document/datasheet/group3/c7/90/d3/f6/b7/e7/40/c8/DM00415595/files/DM00415595.pdf/jcr:content/translations/en.DM00415595.pdf?src-supplier=Digi-Key, ComponentLink3URL=http://www.st.com/content/ccc/resource/technical/document/datasheet/group3/c7/90/d3/f6/b7/e7/40/c8/DM00415595/files/DM00415595.pdf/jcr:content/translations/en.DM00415595.pdf?src-supplier=Digi-Key, ComponentLink4Description=http://www.farnell.com/datasheets/2600073.pdf?src-supplier=Newark, ComponentLink4URL=http://www.farnell.com/datasheets/2600073.pdf?src-supplier=Newark, ComponentLink5Description=http://www.farnell.com/datasheets/2600073.pdf?src-supplier=Element14, ComponentLink5URL=http://www.farnell.com/datasheets/2600073.pdf?src-supplier=Element14, Device Class L1=Electromechanical, Device Class L2="Audio Products", Device Class L3=Microphones, Digikey Description="MEMS AUD MIC SENSOR OMNI 4HCLGA", Direction=Omidirectional, Height=1.1mm, Impedance=8R, Lead Free=Yes, Manufacturer Part Number=MP34DT05TR-A, Mouser Description="MP34DT05: 3.6 V MEMS Audio Sensor Omnidirectional Digital Microphone - HCLGA-4LD", Octopart=https://octopart.com/mp34dt05tr-a-stmicroelectronics-87879016, Operating Supply Current=650uA, Output Type=Digital, Packaging="Tape and Reel", Pricing 1="1=1.21000, 10=1.00700, 25=0.93240, 50=0.87760, 100=0.82470, 500=0.70956, 1000=0.66330 (USD)", RoHS=TRUE, Sensing Method=Magnetic, Shape=Rectangular, Stock 1=2737, Supplier 1=Digi-Key, Termination=Solder, Voltage Rating=1.8V
U3: library part CMP-00514-1, "IC 512MB FLASH 64MB DRAM 24FBGA", Manufacturer="Cypress Semiconductor Corp", Manufacturer Part Number=S71KS512SC0BHV000, Package / Case=24-VBGA, Supplier Device Package=24-FBGA(6x8), Supplier Part Number 1=428-S71KS512SC0BHV000-ND, Voltage - Supply=1.8V, Category=Memory, ComponentLink1Description=http://www.cypress.com/file/322936/download?src-supplier=Digi-Key, ComponentLink1URL=http://www.cypress.com/file/322936/download?src-supplier=Digi-Key, Interface="Parallel, Serial", Memory Format="FLASH, RAM", Memory Size="512Mbit Flash, 64Mbit RAM", Memory Type=Non-Volatile, Pricing 1="1=17.40000, 10=16.10400, 25=15.88480, 40=15.68525, 80=13.74600, 338=13.15666, 676=13.07114, 1014=12.18701 (USD)", RoHS=Yes, Series="HyperFlash™ + HyperRAM™ KS", Speed=100MHz, Supplier 1=Digi-Key
U4: library part CMP-00477-1, "IC EEPROM 2MBIT 1MHZ 8SO", Frequency="0.4 MHz", Manufacturer=STMicroelectronics, Operating Supply Voltage (Max)="5.5 V", Operating Supply Voltage (Min)="1.8 V", Operating Supply Voltage (Typ)="2.5/3.3/5 V", Operating Temp Range="-40C to 85C", Operating Temperature (Max)=85C, Operating Temperature (Min)=-40C, Operating Temperature Classification=Industrial, Package Type="SO N", Supplier Part Number=497-11600-2-ND, Supply Current="3 mA", Access Time (Max)="900 ns", ComponentLink1Description=cd00290537-117248-13031871.pdf, ComponentLink1URL=https://datasheet.ciiva.com/13031/cd00290537-117248-13031871.pdf, ComponentLink2Description=getdatasheetpartid-492578-15123683.pdf, ComponentLink2URL=https://datasheet.ciiva.com/15123/getdatasheetpartid-492578-15123683.pdf, ComponentLink3Description=cd00290537-1912489.pdf, ComponentLink3URL=https://datasheet.ciiva.com/1912/cd00290537-1912489.pdf, ComponentLink4Description=cd00290537-1912488.pdf, ComponentLink4URL=https://datasheet.ciiva.com/1912/cd00290537-1912488.pdf, ComponentLink5Description=cd00290537-1912487.pdf, ComponentLink5URL=https://datasheet.ciiva.com/1912/cd00290537-1912487.pdf, ComponentLink6Description=cd00290537-16448168.pdf, ComponentLink6URL=https://datasheet.ciiva.com/16448/cd00290537-16448168.pdf, Data Retention=40, Density="2097152 Bit", Interface Type="Serial (I2C)", Manufacturer Part Number=M24M02-DRMN6TP, Mounting="Surface Mount", Organization=256Kx8, Packaging="Tape and Reel", Pin Count=8, Programmable=Yes, Rad Hardened=No, Supplier=Digikey, Write Protection=Yes
U5: library part CMP-00165-1, "NOR Flash Serial-SPI 3V 256M-bit 256M x 1bit 8ns 16-Pin SOIC", Manufacturer="Cypress Semiconductor Corp", Operating Temperature="-40°C ~ 85°C (TA)", Supplier Device Package=16-SO, Supplier Part Number=S25FL256SAGMFIR03-ND, Voltage - Supply="2.7 V ~ 3.6 V", ComponentLink1Description=download, ComponentLink1URL=http://www.cypress.com/file/177966/download, Format - Memory=FLASH, Interface="SPI Serial", Manufacturer Part Number=S25FL256SAGMFIR03, Memory Size="256M (32M x 8)", Memory Type="FLASH - NOR", Speed=133MHz, Supplier=Digi-Key
U6_CON1 U6_CON2 U7_CON1 U7_CON2: library part CMP-01322-1, "Current Monitor Regulator High/Low-Side 10mA 10-VSSOP", Case/Package=VSSOP, Manufacturer="Texas Instruments", Max Operating Temperature=125°C, Min Operating Temperature=-40°C, Output Current=10mA, Supplier Part Number 1=595-INA233AIDGSR, Accuracy=0.1%, Category="Amplifiers - Op Amps, Buffer, Instrumentation", ComponentLink1Description=http://www.ti.com/lit/ds/symlink/ina233.pdf?src-supplier=Digi-Key, ComponentLink1URL=http://www.ti.com/lit/ds/symlink/ina233.pdf?src-supplier=Digi-Key, Manufacturer Part Number=INA233AIDGSR, Mount="Surface Mount", Packaging="Tape and Reel", Pricing 1="1=3.31000, 10=2.98000, 50=2.82000, 100=2.32000, 1000=1.67000, 10000=1.60000 (USD)", RoHS=Yes, RoHS Compliant=Yes, Stock 1=2070, Supplier 1=Mouser
X1_CON1 X1_CON2: library part CMP-01221-1, "67 Position Female Connector M.2 (NGFF) Mini Card Gold 0.020\" (0.50mm) Black", Color=Black, Contact Current Rating=500mA, Insulation Resistance=500MR, Manufacturer="TE Connectivity", Manufacturer Part Number=2199230-4, Max Operating Temperature=80°C, Min Operating Temperature=-40°C, Package Quantity=1, Supplier Part Number 1=A115904CT-ND, Voltage Rating=50V, Category="Card Edge Connectors", ComponentLink1Description=https://datasheet.ciiva.com/28797/1918022-28797830.pdf?src-supplier=Element14, ComponentLink1URL=https://datasheet.ciiva.com/28797/1918022-28797830.pdf?src-supplier=Element14, ComponentLink2Description=https://datasheet.ciiva.com/18495/eng-cd-2199230-b1-c-2199230-b1-18495978.pdf?src-supplier=Digi-Key, ComponentLink2URL=https://datasheet.ciiva.com/18495/eng-cd-2199230-b1-c-2199230-b1-18495978.pdf?src-supplier=Digi-Key, ComponentLink3Description=https://datasheet.ciiva.com/18495/eng-cd-2199230-b1-c-2199230-b1-18495979.pdf?src-supplier=Digi-Key, ComponentLink3URL=https://datasheet.ciiva.com/18495/eng-cd-2199230-b1-c-2199230-b1-18495979.pdf?src-supplier=Digi-Key, ComponentLink4Description=https://datasheet.ciiva.com/18495/eng-cd-2199230-b1-c-2199230-b1-18495980.pdf?src-supplier=Digi-Key, ComponentLink4URL=https://datasheet.ciiva.com/18495/eng-cd-2199230-b1-c-2199230-b1-18495980.pdf?src-supplier=Digi-Key, ComponentLink5Description=https://datasheet.ciiva.com/22714/1918022-22714780.pdf?src-supplier=Element14, ComponentLink5URL=https://datasheet.ciiva.com/22714/1918022-22714780.pdf?src-supplier=Element14, ComponentLink6Description=https://datasheet.ciiva.com/28797/1918022-28797822.pdf?src-supplier=Element14, ComponentLink6URL=https://datasheet.ciiva.com/28797/1918022-28797822.pdf?src-supplier=Element14, Contact Material="Copper Alloy", Contact Plating=Gold,Matte, Current Rating=500mA, ELV=Compliant, Gender=Female, Height=3.2mm, Housing Color=Black, Housing Material=Thermoplastic, Insulation Material=Thermoplastic, Length=0.862inch, Mount="Surface Mount", Number of Contacts=67, Number of Positions=67, Number of Rows=2, Orientation="Right Angle", Packaging="Tape and Reel", PCB Mounting Orientation="Right Angle", Pitch=0.5mm, Pricing 1="1=1.29000, 10=1.13700, 25=1.07000, 50=1.02560, 100=0.98100, 250=0.89180, 500=0.80262 (USD)", REACH SVHC=Unknown, RoHS=Yes, RoHS Compliant=Yes, Row Spacing=7.55mm, Stock 1=14351, Supplier 1=Digi-Key, Termination=Solder, Width=8.7mm

## Via types
v1: diameter 0.4, hole 0.2, Top Layer to Bottom Layer, tented both sides, 713 vias
v2: diameter 3.5, hole 2.2, Top Layer to Bottom Layer, 11 vias
v3: diameter 5, hole 2.7, Top Layer to Bottom Layer, tented both sides, 2 vias
v4: diameter 3, hole 2.7, Top Layer to Bottom Layer, 1 vias
v5: diameter 3, hole 2.7, Top Layer to Bottom Layer, tented both sides, 1 vias

## Nets (pads, with @x,y where several pads share a name; then routed paths per layer and width w, separated by ;. In a path a pad name is that pad's centre, name@x,y a point inside that pad or via, vN(x,y) a via of type N, cw(c..) or ccw(c..) an arc to the next point about the centre after c; other vN are vias at no path point)
3V3_CON_CON1: J4_CON1.1 R14_CON1.1 X1_CON1.2 X1_CON1.4 X1_CON1.72 X1_CON1.74 | length 36.3
  Top Layer w0.3: v1(18.774,54.5) X1_CON1.72@19.775,54.5 ; v1(18.8,55) X1_CON1.74@19.775,55 ; X1_CON1.2@19.775,37 18.876,37 18.6,37.276 18.824,37.5 X1_CON1.4@19.775,37.5
  Top Layer w0.4: J4_CON1.1@6.7,59.5 v1(7.6,59.5) ; 18.646,37.322 18.1,37.868 18.1,53.826 v1(18.774,54.5)
  Bottom Layer w0.4: v1(7.6,59.5) 7.915,59.5 10.615,56.8 14,56.8 16.031,54.769 18.774,54.769
3V3_CON_CON2: J4_CON2.1 R14_CON2.1 X1_CON2.2 X1_CON2.4 X1_CON2.72 X1_CON2.74 | length 37
  Top Layer w0.25: 7.1,2.5 v1(7.607,2.5) ; v1(18.773,6.998) 18.774,6.999 19.774,6.999 X1_CON2.2@19.775,7 ; v1(18.784,7.522) 18.795,7.511 19.764,7.511 X1_CON2.4@19.775,7.5
  Top Layer w0.3: 18.643,24.671 18.972,25 19.368,25 X1_CON2.74@19.775,25 ; 18.729,24.754 18.983,24.5 X1_CON2.72@19.775,24.5
  Top Layer w0.4: 18.743,24.767 18.205,24.229 18.205,8.102 v1(18.784,7.522) 18.773,7.51 v1(18.773,6.998)
  Bottom Layer w0.25: v1(7.607,2.5) R14_CON2.1@8.125,2.5
  Bottom Layer w0.4: R14_CON2.1@8.125,2.5 8.15,2.5 8.175,2.525 8.175,2.712 9.963,4.5 17.433,4.5 18.784,5.851 18.784,6.987 v1(18.773,6.998)
CON1_GP_D_N0: J1.G7 P1.G7 X1_CON1.5 | length 43.2
  Top Layer w0.1: X1_CON1.5@12.225,37.75 11.6,37.75 11.475,37.625 11.071,37.625 10.75,37.304 10.75,35.349 14.25,31.849 14.25,29.684 15.761,28.173 16.102,27.833 16.102,25.382 17.049,24.434 17.049,17.472 14.634,15.057 14.457,15.057 v1(14.4,15)
  Bottom Layer w0.1: P1.G7@-0.095,14.355 -0.095,13.904 -0.036,13.845 6.8,13.845 7.767,14.812 14.191,14.812 14.38,15 v1(14.4,15)
  other v1: -0.52,14.355
CON1_GP_D_N1: J1.H8 P1.H8 X1_CON1.37 | length 48.3
  Top Layer w0.1: X1_CON1.37@12.225,45.75 11.6,45.75 11.475,45.625 10.964,45.625 9.971,44.632 9.971,35.209 13.152,32.028 13.152,29.995 15.554,27.593 15.554,24.62 15.993,24.18 15.993,18.189 14.626,16.821 14.449,16.821 v1(14.392,16.763)
  Bottom Layer w0.1: P1.H8@1.175,15.625 1.175,15.174 1.234,15.115 4.212,15.115 5.497,16.4 14.205,16.4 14.334,16.529 14.334,16.706 v1(14.392,16.763)
  other v1: 0.763,15.625
CON1_GP_D_N2: J1.G10 P1.G10 X1_CON1.43 | length 49.1
  Top Layer w0.1: X1_CON1.43@12.225,47.25 11.6,47.25 11.475,47.125 10.819,47.125 9.177,45.483 9.177,35.183 12.129,32.231 12.129,30.251 15.104,27.276 15.104,24.691 14.683,24.27 14.683,18.438 14.576,18.332 14.4,18.332 v1(14.342,18.275)
  Bottom Layer w0.1: P1.G10@-0.095,18.165 -0.095,17.714 -0.036,17.655 4.301,17.655 4.496,17.85 14.095,17.85 14.285,18.04 14.285,18.217 v1(14.342,18.275)
  other v1: -0.52,18.165
CON1_GP_D_N3: J1.H11 P1.H11 X1_CON1.49 | length 47.7
  Top Layer w0.1: X1_CON1.49@12.225,48.75 11.6,48.75 11.457,48.607 11.255,48.607 11.214,48.566 10.746,48.566 8.384,46.204 8.384,35.089 11.3,32.173 11.3,30.264 14.654,26.91 14.654,25.465 13.655,24.466 13.655,22.043 13.655,19.875 13.596,19.816 13.591,19.816 13.487,19.712 v1(13.406,19.712)
  Bottom Layer w0.1: P1.H11@1.175,19.435 1.175,18.984 1.234,18.925 4.001,18.925 4.426,19.35 13.22,19.35 13.348,19.478 13.348,19.655 v1(13.406,19.712)
  other v1: 0.763,19.435
CON1_GP_D_N4: J1.G13 P1.G13 X1_CON1.55 | length 42.4
  Top Layer w0.1: v1(8.094,21.559) 8.152,21.617 8.317,21.617 10.5,23.8 10.5,32.15 7.582,35.068 7.582,46.915 10.792,50.125 11.475,50.125 11.6,50.25 X1_CON1.55@12.225,50.25
  Bottom Layer w0.1: P1.G13@-0.095,21.975 -0.095,21.524 -0.036,21.465 4.048,21.465 4.053,21.459 7.913,21.459 8.013,21.559 v1(8.094,21.559)
  other v1: -0.52,21.975
CON1_GP_D_N5: J1.H14 P1.H14 X1_CON1.61 | length 41.6
  Top Layer w0.1: v1(8.087,22.941) 8.123,22.905 8.311,22.905 9.8,24.395 9.8,31.946 6.671,35.074 6.671,47.65 10.647,51.625 11.475,51.625 11.6,51.75 X1_CON1.61@12.225,51.75
  Bottom Layer w0.1: P1.H14@1.175,23.245 1.175,22.794 1.234,22.735 7.881,22.735 v1(8.087,22.941)
  other v1: 0.763,23.245
CON1_GP_D_N6: J1.G16 P1.G16 X1_CON1.67 | length 41.9
  Top Layer w0.1: v1(8.1,25.4) 8.157,25.457 8.334,25.457 9.102,26.225 9.102,31.696 5.753,35.045 5.753,48.1 10.778,53.125 11.475,53.125 11.6,53.25 X1_CON1.67@12.225,53.25
  Bottom Layer w0.1: P1.G16@-0.095,25.785 -0.095,25.334 -0.036,25.275 7.804,25.275 7.809,25.27 7.891,25.27 8.021,25.4 v1(8.1,25.4)
  other v1: -0.59,25.785
CON1_GP_D_N7: J1.H17 P1.H17 X1_CON1.73 | length 40.9
  Top Layer w0.1: v1(8.1,27.1) 8.157,27.157 8.334,27.157 8.4,27.223 8.4,31.498 4.825,35.074 4.825,48.685 10.764,54.625 11.475,54.625 11.6,54.75 X1_CON1.73@12.225,54.75
  Bottom Layer w0.1: P1.H17@1.175,27.055 1.175,26.604 1.234,26.545 7.722,26.545 8.043,26.866 8.043,27.043 v1(8.1,27.1)
  other v1: 0.68,27.055
CON1_GP_D_P0: J1.G6 P1.G6 X1_CON1.3 | length 43.3
  Top Layer w0.1: X1_CON1.3@12.225,37.25 11.6,37.25 11.475,37.375 11.175,37.375 11,37.2 11,35.452 14.5,31.952 14.5,29.788 16.115,28.173 16.352,27.936 16.352,25.485 17.299,24.538 17.299,17.369 14.811,14.881 14.811,14.704 v1(14.754,14.646)
  Bottom Layer w0.1: P1.G6@-0.095,13.085 -0.095,13.536 -0.036,13.595 6.904,13.595 7.87,14.562 14.492,14.562 14.519,14.589 14.696,14.589 v1(14.754,14.646)
  other v1: -0.52,13.085
CON1_GP_D_P1: J1.H7 P1.H7 X1_CON1.35 | length 48.3
  Top Layer w0.1: X1_CON1.35@12.225,45.25 11.6,45.25 11.475,45.375 11.068,45.375 10.221,44.528 10.221,35.312 13.402,32.132 13.402,30.098 15.804,27.696 15.804,24.723 16.243,24.284 16.243,18.085 14.803,16.644 14.803,16.467 v1(14.745,16.41)
  Bottom Layer w0.1: P1.H7@1.175,14.355 1.175,14.806 1.234,14.865 4.316,14.865 5.601,16.15 14.308,16.15 14.511,16.353 14.688,16.353 v1(14.745,16.41)
  other v1: 0.763,14.355
CON1_GP_D_P2: J1.G9 P1.G9 X1_CON1.41 | length 49.1
  Top Layer w0.1: X1_CON1.41@12.225,46.75 11.6,46.75 11.475,46.875 10.922,46.875 9.427,45.379 9.427,35.286 12.379,32.334 12.379,31.878 12.379,30.355 15.354,27.379 15.354,24.588 14.933,24.167 14.933,19.94 14.933,18.335 14.753,18.155 14.753,17.978 v1(14.696,17.921)
  Bottom Layer w0.1: P1.G9@-0.095,16.895 -0.095,17.346 -0.036,17.405 4.405,17.405 4.6,17.6 14.198,17.6 14.462,17.864 14.638,17.864 v1(14.696,17.921)
  other v1: -0.52,16.895
CON1_GP_D_P3: J1.H10 P1.H10 X1_CON1.47 | length 47.7
  Top Layer w0.1: X1_CON1.47@12.225,48.25 12.125,48.35 11.448,48.35 11.441,48.357 11.359,48.357 11.318,48.316 10.85,48.316 8.634,46.1 8.634,35.193 11.55,32.277 11.55,30.367 14.904,27.014 14.904,25.362 13.905,24.363 13.905,22.147 13.905,19.771 13.817,19.683 13.817,19.416 v1(13.759,19.359)
  Bottom Layer w0.1: P1.H10@1.175,18.165 1.175,18.616 1.234,18.675 4.104,18.675 4.529,19.1 13.324,19.1 13.525,19.301 13.702,19.301 v1(13.759,19.359)
  other v1: 0.763,18.165
CON1_GP_D_P4: J1.G12 P1.G12 X1_CON1.53 | length 42.3
  Top Layer w0.1: v1(8.471,21.23) 8.523,21.282 8.523,21.469 10.75,23.696 10.75,32.254 7.832,35.172 7.832,46.812 10.895,49.875 11.475,49.875 11.6,49.75 X1_CON1.53@12.225,49.75
  Bottom Layer w0.1: P1.G12@-0.095,20.705 -0.095,21.156 -0.036,21.215 3.944,21.215 3.95,21.209 8.239,21.209 8.245,21.215 8.269,21.215
  other v1: -0.52,20.705
CON1_GP_D_P5: J1.H13 P1.H13 X1_CON1.59 | length 41.6
  Top Layer w0.1: v1(8.34,22.509) 8.34,22.581 10.05,24.291 10.05,32.049 6.921,35.178 6.921,47.546 10.75,51.375 11.475,51.375 11.6,51.25 X1_CON1.59@12.225,51.25